# Altium PCB PCB.PcbDoc
Units mm, origin at the board's own origin, x right, y up, seen from the top; angles counter-clockwise.
Board outline 72.75 x 86.32 mm, 2 copper layers (Top Layer, Bottom Layer); 70 components, 56 nets, 293 pads, 65 vias.
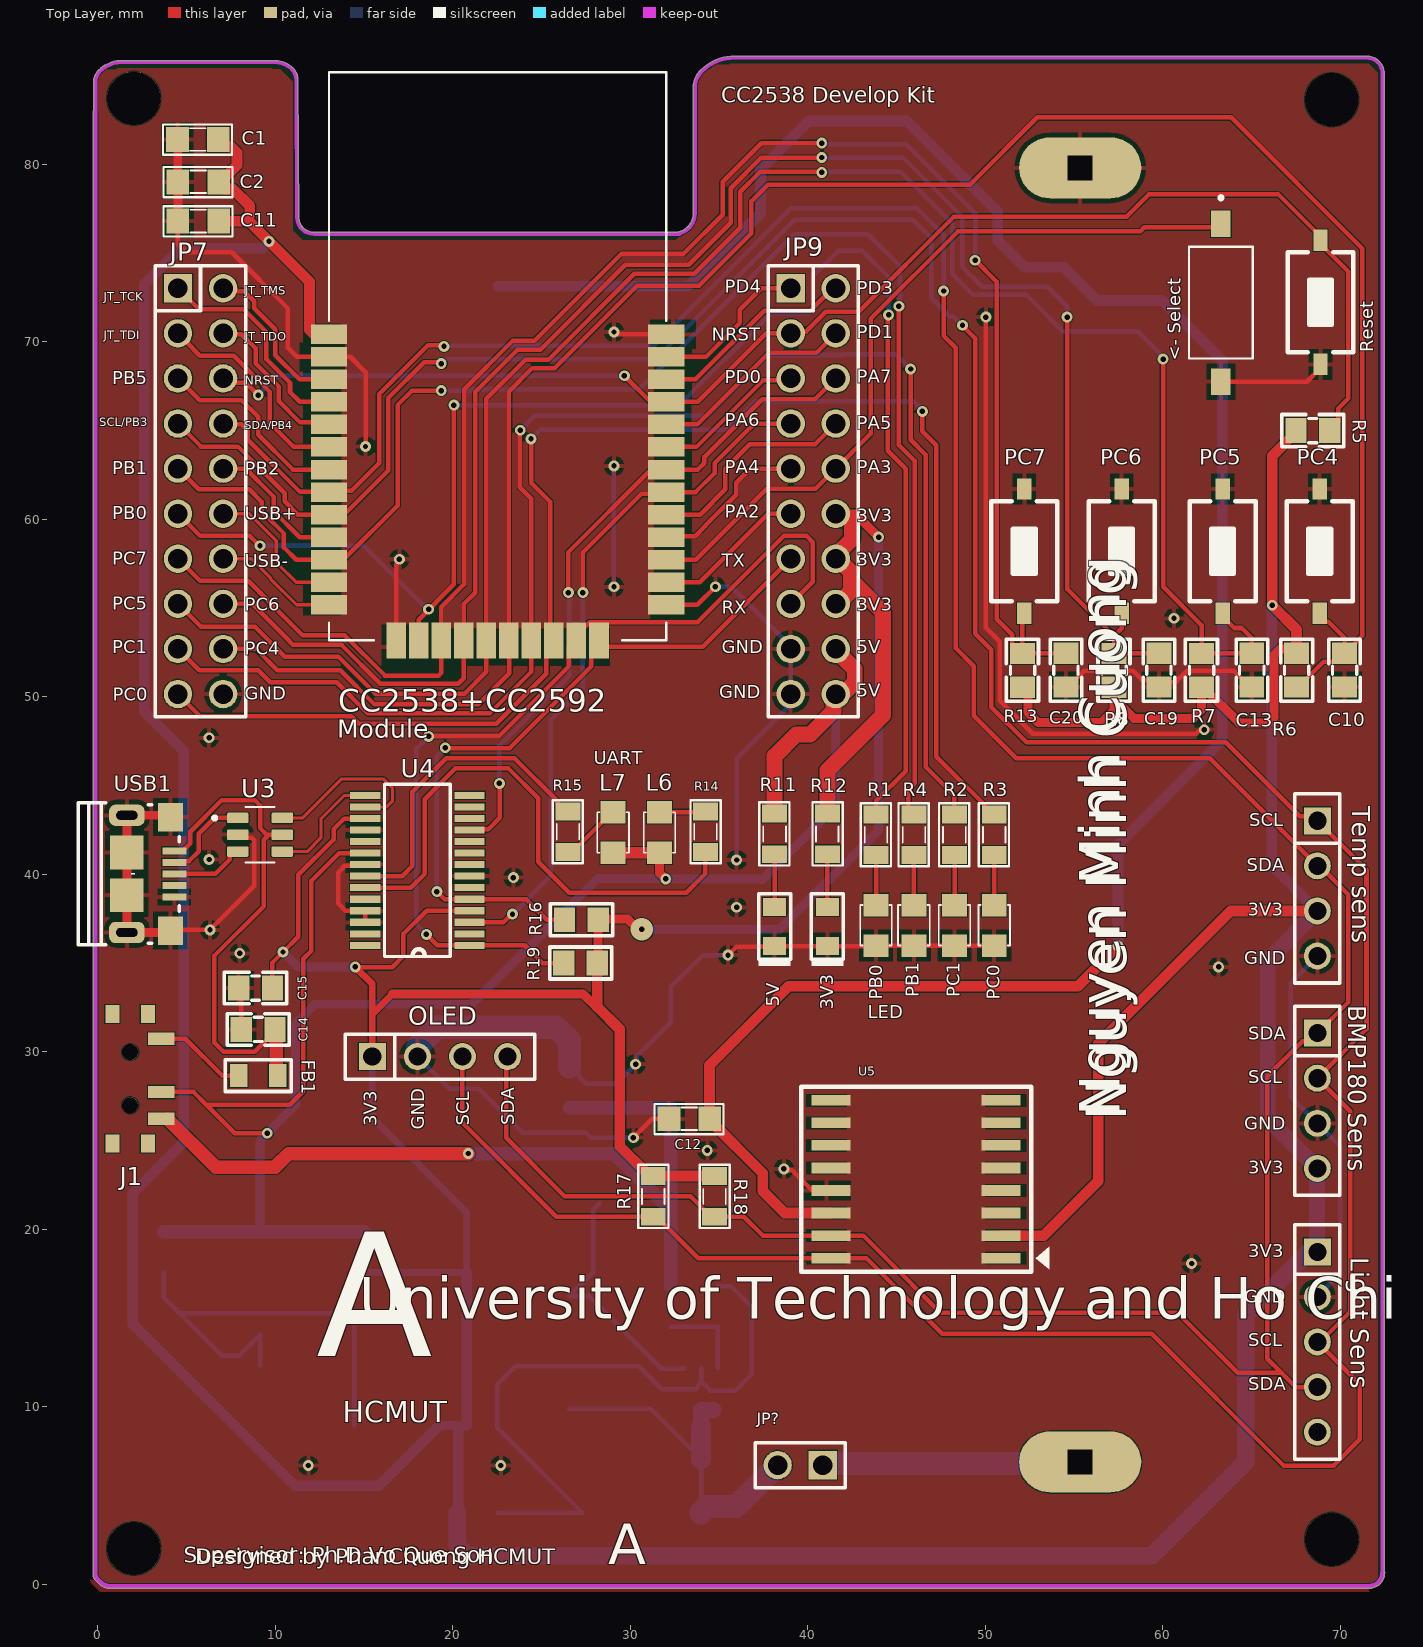
[diagram p0: Top Layer view]
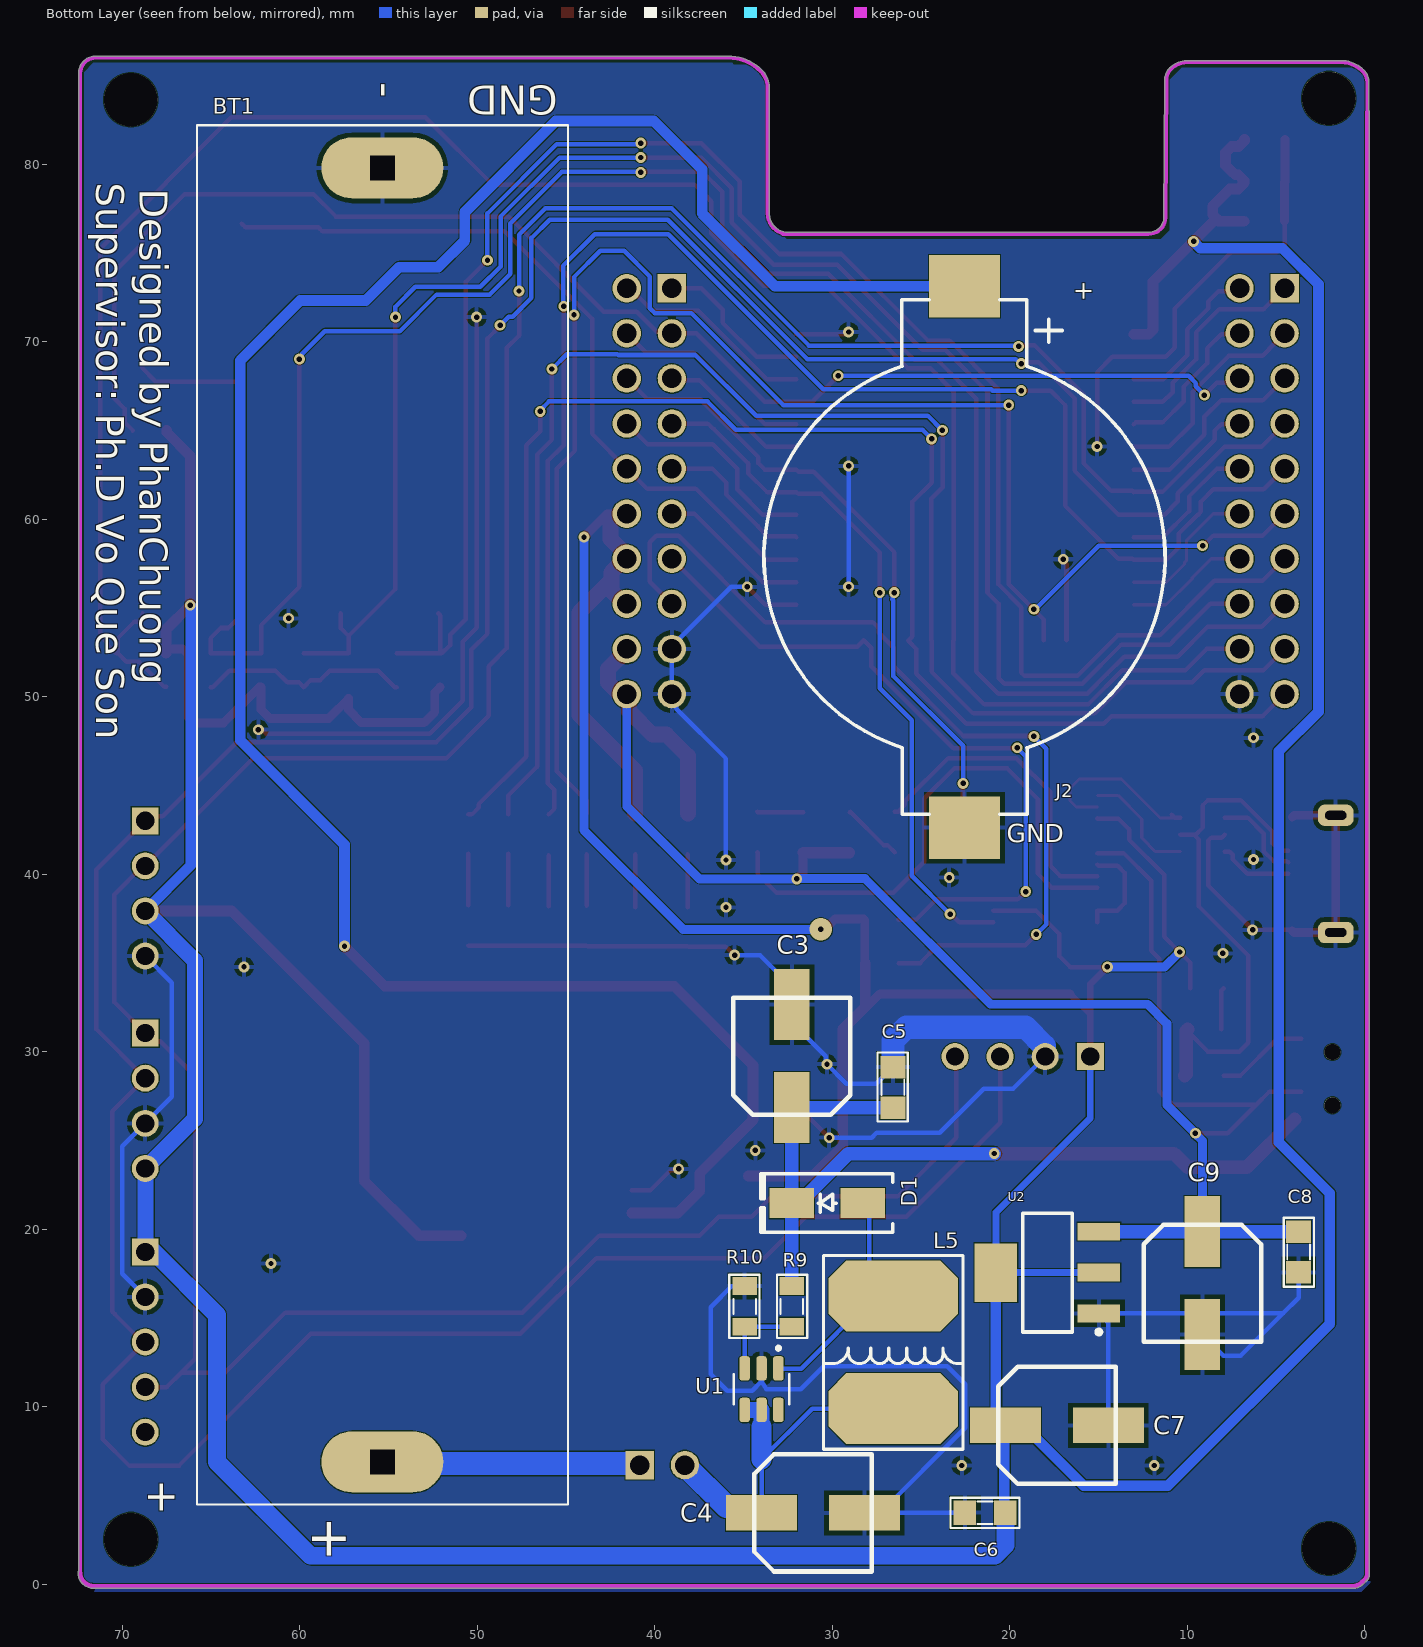
[diagram p1: Bottom Layer view, seen from below]
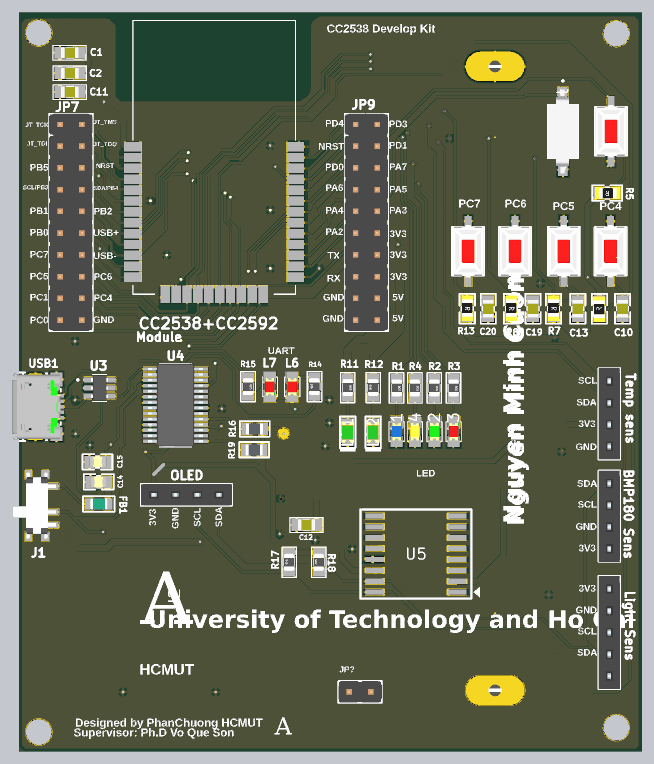
[diagram p2: 3D render of the assembled board from above, using the file's embedded part models]
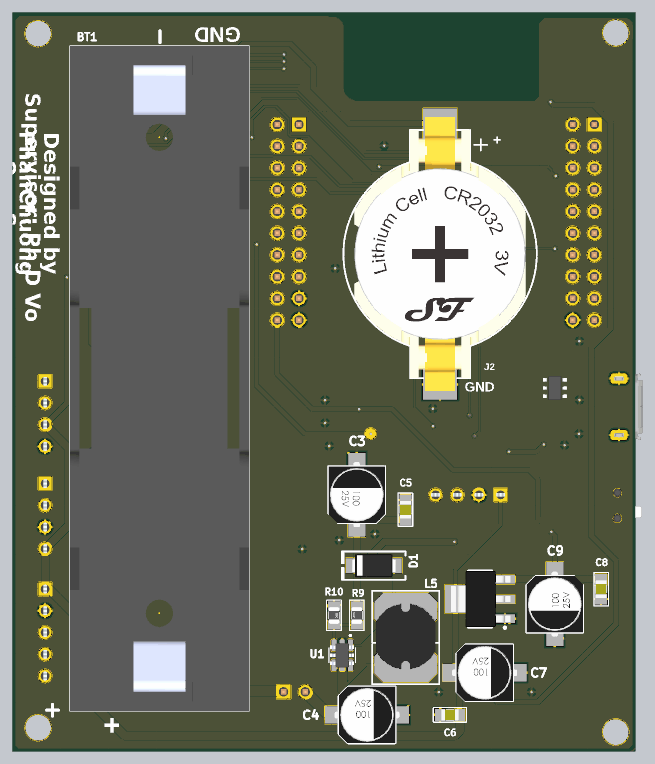
[diagram p3: 3D render of the assembled board from below, using the file's embedded part models]

## Layer stack, top to bottom
Top Solder: solder mask 0.0102, Solder Resist, Dk 3.5
Top Layer: signal copper 0.0356
Dielectric 1: dielectric 0.32, FR-4, Dk 4.8
Bottom Layer: signal copper 0.0356
Bottom Solder: solder mask 0.0102, Solder Resist, Dk 3.5

## Board outline
-0.252,0.486 ccw(c0.18,0.527) -0.127,0.22 0.111,-0.019 ccw(c0.635,0.505) 0.635,-0.236 71.622,-0.236 ccw(c71.622,0.635) 72.492,0.635 ccw(c72.365,0.635) 72.467,0.711 72.467,85.112 ccw(c71.496,85.111) 72.183,85.797 ccw(c71.497,85.112) 71.497,86.081 35.876,86.081 ccw(c35.876,83.377) 33.964,85.289 ccw(c34.956,84.297) 33.554,84.339 33.553,77.216 cw(c32.487,77.216) 32.487,76.15 12.204,76.15 cw(c12.204,77.057) 11.562,76.415 cw(c12.121,76.974) 11.331,76.974 11.278,84.71 ccw(c11.081,84.72) 11.278,84.731 ccw(c10.309,84.731) 10.994,85.416 ccw(c10.002,84.424) 10.044,85.826 1.353,85.827 ccw(c1.353,83.991) 0.055,85.289 ccw(c0.74,84.604) -0.229,84.604 -0.229,83.007 ccw(c-0.127,82.931) -0.254,82.931 -0.254,0.508 ccw(c-0.127,0.508)

## Design rules (kind name [scope] priority, off if disabled: settings)
Clearance [All] p1: gap=0.05 ignorepadtopadclearanceinfootprint=TRUE
DiffPairsRouting [All] p1: maxlimit=0.254 minlimit=0.127 mostfreqgap=0.178 toplayer_minwidth=0.178 toplayer_maxwidth=0.381 toplayer_prefwidth=0.254 bottomlayer_minwidth=0.178 bottomlayer_maxwidth=0.381 bottomlayer_prefwidth=0.254 maxuncoupledlength=12.7
PlaneClearance [All] p1: clearance=0.008
PlaneConnect [All] p1: planeconnectstyle=Direct reliefexpansion=0.508 reliefentries=4 reliefconductorwidth=0.254 reliefairgap=0.254
PolygonConnect PolygonConnect_2 [All vs IsNamedPolygon('GND_L01_P-001')] p1: connectstyle=Direct reliefconductorwidth=0.254 reliefentries=4 polygonreliefangle="90 Angle" airgapwidth=0.254
PolygonConnect PolygonConnect_1 [All vs IsNamedPolygon('GND_L01_P-001')] p2: connectstyle=Direct reliefconductorwidth=0.254 reliefentries=4 polygonreliefangle="90 Angle" airgapwidth=0.254
PolygonConnect [All] p3: connectstyle=Relief reliefconductorwidth=0.254 reliefentries=4 polygonreliefangle="90 Angle" airgapwidth=0.254
RoutingVias [All] p1: holewidth=0.305 width=0.61 viastyle="Through Hole" minholewidth=0.254 minwidth=0.508 maxholewidth=0.305 maxwidth=1.27
SolderMaskExpansion [All] p1: expansion=0.102 istentingtop=FALSE
Width [All] p1: maxlimit=1.3 minlimit=0.254 preferedwidth=0.254
27 further rules are at their usual default settings.

## Classes and differential pairs
component class RTC: C11 C12 J2 R17 R18 U5
component class Power: 3V3 5V BT1 C3 C4 C5 C6 C7 C8 C9 D1 FB1 J1 JP? L5 R9 R10 R11 R12 U1 U2
component class MCU: "<- Select" "BMP180 Sens" C1 C2 C10 C13 C19 C20 JP7 JP9 "Light Sens" Module OLED PB0 PB1 PC0 PC1 PC4 PC5 pc6 PC6 PC7 R1 R2 R3 R4 R5 R6 R7 R8 R13 Reset "Temp sens"
component class Flashing: C14 C15 L6 L7 R14 R15 R16 R19 U3 U4 USB1
differential pair USB1: +USB1_P -USB1_N
differential pair USB0: +USB0_P -USB0_N

## Components (designator, comment, footprint, x,y, rotation, side; value= is the part's Value field where it differs from the comment)
3V3 "LED-GREEN" LED_SMD0805_GREEN 41.104,37.041 r270 top (schematic designator LD2)
5V "LED-GREEN" LED_SMD0805_GREEN 38.132,37.041 r270 top (schematic designator LD1)
"<- Select" "Select" SW_KAE01SGGT 63.271,72.187 r270 top
"BMP180 Sens" "BMP180 Sen" "JP 1x4 CT" 68.707,31.039 r270 top (schematic designator JP3)
BT1 "BH-18650-PC" BAT_BH-18650-PC 55.347,43.331 r270 bottom locked
C1 "1uF" SM-0805 5.639,81.382 r0 top value=103
C2 "100nF" SM-0805 5.664,78.994 r0 top value=103
C3 "22uF" "tu nhom 6.3 (D)" 32.283,29.743 r90 bottom
C4 "22uF" "tu nhom 6.3 (D)" 31.09,4.011 r180 bottom
C5 "1uF" SM-0805 26.588,27.986 r270 bottom value=103
C6 "100nF" SM-0805 21.391,4.023 r180 bottom value=103
C7 "10uF" "tu nhom 6.3 (D)" 17.348,8.941 r180 bottom
C8 "100nF" SM-0805 3.734,18.708 r90 bottom value=103
C9 "10uF" "tu nhom 6.3 (D)" 9.148,16.951 r270 bottom
C10 "104" "tu 0805" 70.247,51.487 r270 top
C11 "1uF" SM-0805 5.664,76.784 r0 top value=103
C12 "1uF" SM-0805 33.325,26.213 r0 top value=103
C13 "104" "tu 0805" 65.015,51.487 r270 top
C14 "100nF" "Cap 0805" 9.042,31.242 r180 top
C15 "100nF" "Cap 0805" 8.89,33.579 r0 top
C19 "104" "tu 0805" 59.782,51.487 r270 top
C20 "104" "tu 0805" 54.55,51.487 r270 top
D1 "SS34" "DIODE SMA" 30.283,21.463 r0 bottom
FB1 "CIC21J601NE" INDC0805 9.042,28.651 r180 top
J1 "CUS-12TB" CUS-12B 1.829,28.473 r270 top
J2 "BU2032SM-HD-G" "BATTERY HOLDER_BU2032SM-HD-G" 22.555,57.861 r270 bottom
JP7 "JP 2x10 2.54" "JP 2x10 DT" 5.791,61.57 r270 top
JP9 "JP 2x10 2.54" "JP 2x10 DT" 40.31,61.57 r270 top
JP? "Test point" "JP 1x2 DT" 40.843,6.706 r180 top
L5 "22uH SMD" "Cuon Cam 7x7x5" 26.568,9.246 r180 bottom
L6 "LED 0805" LED-0805-Red 31.648,41.199 r90 top
L7 "LED 0805" LED-0805-Red 29.032,41.199 r90 top
"Light Sens" "Light Sen" "JP 1x5 CT" 68.707,18.72 r270 top (schematic designator JP2)
Module "HM10" CC2538+CC2541 13.029,53.169 r0 top
OLED "OLED" "JP 1x4 CT" 15.469,29.718 r0 top
PB0 "LED 0805" LED-0805-Blue 43.847,38.254 r270 top (schematic designator L1)
PB1 "LED 0805" LED-0805-Yellow 45.981,38.254 r270 top (schematic designator L4)
PC0 "LED 0805" LED-0805-Red 50.502,38.254 r270 top (schematic designator L3)
PC1 "LED 0805" LED-0805-Green 48.267,38.254 r270 top (schematic designator L2)
PC4 "SW-SMD" SW-SMD 68.841,58.191 r270 top (schematic designator S1)
PC5 "SW-SMD" SW-SMD 63.373,58.191 r270 top (schematic designator S2)
PC6 "SW-SMD" SW-SMD 57.683,58.191 r270 top (schematic designator S3)
PC7 "SW-SMD" SW-SMD 52.197,58.191 r270 top (schematic designator S5)
R1 "1k" RES-SMD-0805 43.847,42.215 r270 top
R2 "1k" RES-SMD-0805 48.26,42.215 r270 top
R3 "1k" RES-SMD-0805 50.502,42.215 r270 top
R4 "1k" RES-SMD-0805 45.981,42.215 r270 top
R5 "4K7" "tro smd 0805" 68.453,64.922 r180 top
R6 "4K7" "tro smd 0805" 67.475,51.484 r90 top
R7 "4K7" "tro smd 0805" 62.243,51.484 r270 top
R8 "4K7" "tro smd 0805" 57.315,51.484 r270 top
R9 "22k" RES-SMD-0805 32.283,15.647 r90 bottom
R10 "3k" RES-SMD-0805 34.94,15.646 r270 bottom
R11 "1k" RES-SMD-0805 38.132,42.266 r270 top
R12 "1k" RES-SMD-0805 41.104,42.266 r90 top
R13 "4K7" "tro smd 0805" 52.159,51.484 r270 top
R14 "1k" RES-SMD-0805 34.239,42.38 r90 top
R15 "1k" RES-SMD-0805 26.492,42.38 r270 top
R16 "470" "RES 0805" 27.254,37.414 r180 top
R17 "4K7" RES-SMD-0805 31.293,21.844 r90 top
R18 "4K7" RES-SMD-0805 34.747,21.844 r90 top
R19 "470" "RES 0805" 27.203,34.976 r180 top
Reset "SW-SMD" SW-SMD 68.885,72.212 r270 top (schematic designator S4)
"Temp sens" "Temp Sen" "JP 1x4 CT" 68.707,43.002 r270 top (schematic designator JP1)
U1 "MT3608" SOT95P280X145-6N#1 33.99,10.984 r270 bottom
U2 "AMS1117-3.3V" SOT223 17.886,17.551 r90 bottom value="AMS1117-3.3V SOT223"
U3 "USBLC6-2SC6" SOT95P280X145-6N#2 9.144,42.215 r0 top
U4 "FT232RL" TSSOP28_25.5_295_15X58_SMD 18.009,40.208 r180 top
U5 "DS3231" SL3016 46.101,22.809 r180 top
USB1 "USB Micro 5p DIP" "USB Micro 5p DIP" 1.643,40.01 r270 top

## Footprints (in the part's own frame and the unit in brackets; to place one, negate y for a bottom-side part, rotate by r counter-clockwise, add the part's x,y. Pads: shape width x height; smd on the part's side, far side on the other; paste and mask are expansions set on the pad)
BAT_BH-18650-PC [mm]
  oval 3.44x6.88 hole 1.38 square: N(-36.45,0) P(36.45,0)
  round 0 all layers, no hole: ""(-28.17,0) ""(27.44,0)
  silkscreen extent -38.85,-10.45 38.85,10.45, body extent -38.85,-10.45 38.85,10.45, height 21.31
"BATTERY HOLDER_BU2032SM-HD-G" [mm]
  rect 3.5x4 smd: 1(-15.25,0) 2(15.25,0)
  silkscreen extent -14.5,-11.3 14.5,11.3, body extent -16,-10 16,10, height 5.3
"Cap 0805" [mm] "Compoment SMD 80x50mil"
  rect 1.2x1.4 smd: 1(-0.946,-0.003) 2(0.954,-0.003)
  silkscreen extent -1.75,-0.89 1.75,0.89, body extent -0.97,-0.61 1.03,0.64, height 1.23
CC2538+CC2541 [mm]
  rect 2.032x1.1 smd mask+0.05: 1(0,17.24) 2(0,15.97) 3(0,14.7) 4(0,13.43) 5(0,12.16) 6(0,10.89) 7(0,9.62) 8(0,8.35) 9(0,7.08) 10(0,5.81) 11(0,4.54) 12(0,3.27) 13(0,2) 13(0,2) 24(19,2) 24(19,2) 25(19,3.27) 26(19,4.54) 27(19,5.81) 28(19,7.08) 29(19,8.35) 30(19,9.62) 31(19,10.89) 32(19,12.16) 33(19,13.43) 34(19,14.7) 35(19,15.97) 36(19,17.24)
  rect 1.1x2.032 smd mask+0.05: 14(3.78,0) 15(5.05,0) 16(6.32,0) 17(7.59,0) 18(8.86,0) 19(10.13,0) 20(11.4,0) 21(12.67,0) 22(13.94,0) 23(15.21,0)
  silkscreen extent 0,0 19,32
"Cuon Cam 7x7x5" [mm] "Cuon Cam 7x7x5"
  oct 7.3x4 smd: 1(0,0.635) 2(0,6.985)
  silkscreen extent -3.94,-1.65 3.94,9.27, body extent -3.5,0.07 3.5,7.8, height 5.02
CUS-12B [mm]
  rect 0.7x1.5 smd: P$1(-2.25,1.75) P$2(0.75,1.75) P$3(2.25,1.75)
  rect 1x0.8 smd: P$4(-3.65,1) P$5(-3.65,-1) P$6(3.65,-1) P$7(3.65,1)
  round 0.9 hole 0.9 unplated: ""(-1.5,0) ""(1.5,0)
  body extent -3.85,-2.8 3.85,2.2, height 1.4
"DIODE SMA" [mm] "SMA"
  rect 2.5x1.7 smd: 1(-2,0) 2(2,0)
  silkscreen extent -3.68,-1.65 3.75,1.65, body extent -2.6,-1.37 2.6,1.37, height 2.4
INDC0805 [mm]
  rect 1x1.3 smd: 1(-1.1,0) 2(1.1,0)
  silkscreen extent -1.85,-0.9 1.85,0.9, body extent -1,-0.65 1,0.65, height 1.18
"JP 1x2 DT" [mm] "2 pins, 1 row, straight, gold plating"
  rect 1.6x1.6 hole 1.1: 1(0,0)
  round 1.6 hole 1.1: 2(2.54,0)
  silkscreen extent -1.27,-1.27 3.81,1.27, body extent -1.27,-1.27 3.81,1.27, height 8.54
"JP 1x4 CT" [mm]
  rect 1.52x1.52 hole 1.02: 1(0,0)
  round 1.52 hole 1.02: 2(2.54,0) 3(5.08,0) 4(7.62,0)
  silkscreen extent -1.52,-1.27 9.14,1.27, body extent -1.52,-1.25 9.14,1.25, height 8.51
"JP 1x5 CT" [mm]
  rect 1.52x1.52 hole 1.02: 1(0,0)
  round 1.52 hole 1.02: 2(2.54,0) 3(5.08,0) 4(7.62,0) 5(10.16,0)
  silkscreen extent -1.52,-1.27 11.68,1.27, body extent -1.52,-1.25 11.68,1.25, height 8.51
"JP 2x10 DT" [mm] "20 pins, dual pin, straight, gold plating"
  rect 1.6x1.6 hole 1.1: 1(-11.43,-1.27)
  round 1.6 hole 1.1: 2(-8.89,-1.27) 3(-6.35,-1.27) 4(-3.81,-1.27) 5(-1.27,-1.27) 6(1.27,-1.27) 7(3.81,-1.27) 8(6.35,-1.27) 9(8.89,-1.27) 10(11.43,-1.27) 11(11.43,1.27) 12(8.89,1.27) 13(6.35,1.27) 14(3.81,1.27) 15(1.27,1.27) 16(-1.27,1.27) 17(-3.81,1.27) 18(-6.35,1.27) 19(-8.89,1.27) 20(-11.43,1.27)
  silkscreen extent -12.7,-2.54 12.7,2.54, body extent -12.7,-2.54 12.7,2.54, height 8.55
LED-0805-Blue [mil]
  rect 50x55 smd: 1(0,0) 2(90,0)
  silkscreen extent 0,-35 90,35, body extent 5,-25 85,25, height 43
LED-0805-Green [mil]
  rect 50x55 smd: 1(0,0) 2(90,0)
  silkscreen extent 0,-35 90,35, body extent 5,-25 85,25, height 43
LED-0805-Red [mil]
  rect 50x55 smd: 1(0,0) 2(90,0)
  silkscreen extent 0,-35 90,35, body extent 5,-25 85,25, height 43
LED-0805-Yellow [mil]
  rect 50x55 smd: 1(0,0) 2(90,0)
  silkscreen extent 0,-35 90,35, body extent 5,-25 85,25, height 43
LED_SMD0805_GREEN [mm]
  rect 1x1.3 smd: 1(-1.1,0) 2(1.1,0)
  silkscreen extent -1.85,-0.9 2.23,0.9, body extent -1.19,-0.75 1.21,0.75, height 0.9
"RES 0805" [mm]
  rect 1.2x1.4 smd: 1(-0.946,-0.01) 2(0.954,-0.01)
  silkscreen extent -1.75,-0.91 1.75,0.89, body extent -1,-0.62 1,0.63, height 0.5
RES-SMD-0805 [mil]
  rect 39.37x55 smd: 1(-45,0) 2(45,0)
  silkscreen extent -70,-34 70,33, body extent -39,-25 39,25, height 31
SL3016 [mm]
  rect 2.2x0.6 smd: 1(-4.795,4.445) 2(-4.795,3.175) 3(-4.795,1.905) 4(-4.795,0.635) 5(-4.795,-0.635) 6(-4.795,-1.905) 7(-4.795,-3.175) 8(-4.795,-4.445) 9(4.795,-4.445) 10(4.795,-3.175) 11(4.795,-1.905) 12(4.795,-0.635) 13(4.795,0.635) 14(4.795,1.905) 15(4.795,3.175) 16(4.795,4.445)
  silkscreen extent -7.49,-5.21 6.48,5.21, body extent -5.33,-5.15 5.33,5.15, height 2.65
SM-0805 [mil] "Compoment SMD 80x50mil"
  rect 50x55 smd: 1(-45,0) 2(45,0)
  silkscreen extent -77,-34 76,33, body extent -40,-25 40,25, height 24
SOT95P280X145-6N#1 [mm]
  rrect50% 1.37x0.59 smd: 1(-1.17,0.95) 2(-1.17,0) 3(-1.17,-0.95) 4(1.17,-0.95) 5(1.17,0) 6(1.17,0.95)
  silkscreen extent -2.4,-1.56 0.85,1.56, body extent -1.45,-1.4 1.45,1.4, height 1.45
SOT95P280X145-6N#2 [mm]
  rrect25% 1.21x0.59 smd: 1(-1.255,0.95) 2(-1.255,0) 3(-1.255,-0.95) 4(1.255,-0.95) 5(1.255,0) 6(1.255,0.95)
  silkscreen extent -2.65,-1.57 0.81,1.57, body extent -1.4,-1.46 1.4,1.46, height 0.4
SOT223 [mm]
  rect 1x2.4 smd: 1(-2.3,-2.9) 2(0,-2.9) 3(2.3,-2.9)
  rect 3.3x2.4 smd: 4(0,2.9)
  silkscreen extent -3.47,-3.02 3.35,1.4, body extent -3.25,-3.56 3.25,3.4, height 1.68
SW-SMD [mm] "Switch SMD type"
  rect 1.2x0.8 smd: 1(-3.5,0) 2(3.5,0)
  silkscreen extent -2.82,-1.85 2.82,1.85, body extent -3.05,-1.85 3.05,1.85, height 2.5
SW_KAE01SGGT [mm]
  rect 1.5x1.1 smd: 1(-4.45,0) 2(4.45,0)
  silkscreen extent -6.01,-1.79 3.15,1.79, body extent -4.9,-1.79 4.9,1.79, height 3.13
"tro smd 0805" [mm]
  rect 1.2x1.4 smd: 1(-0.946,-0.061) 2(0.954,-0.061)
  silkscreen extent -1.75,-0.97 1.75,0.84, body extent -1.56,-0.76 1.44,0.64, height 0.53
TSSOP28_25.5_295_15X58_SMD [mm] "CASE: TSSOP"
  rect 1.7x0.4 smd mask+0.076: 1(-2.938,4.225) 2(-2.938,3.575) 3(-2.938,2.925) 4(-2.938,2.275) 5(-2.938,1.625) 6(-2.938,0.975) 7(-2.938,0.325) 8(-2.938,-0.325) 9(-2.938,-0.975) 10(-2.938,-1.625) 11(-2.938,-2.275) 12(-2.938,-2.925) 13(-2.938,-3.575) 14(-2.938,-4.225) 15(2.938,-4.225) 16(2.938,-3.575) 17(2.938,-2.925) 18(2.938,-2.275) 19(2.938,-1.625) 20(2.938,-0.975) 21(2.938,-0.325) 22(2.938,0.325) 23(2.938,0.975) 24(2.938,1.625) 25(2.938,2.275) 26(2.938,2.925) 27(2.938,3.575) 28(2.938,4.225)
  silkscreen extent -1.85,-4.85 1.85,4.85, body extent -3.2,-4.85 3.2,4.85, height 1.1
"tu 0805" [mm] "Compoment SMD 80x50mil"
  rect 1.2x1.4 smd: 1(-0.946,-0.003) 2(0.954,-0.003)
  silkscreen extent -1.75,-0.89 1.75,0.89, body extent -1.01,-0.64 1.01,0.63, height 0.61
"tu nhom 6.3 (D)" [mm]
  rect 4x2 smd: 1(-2.9,0) 2(2.9,0)
  silkscreen extent -3.3,-3.3 3.3,3.3, body extent -3.8,-3.3 3.8,3.3, height 8
"USB Micro 5p DIP" [mm]
  rect 0.4x1.35 smd mask+0.05: 1(-1.3,2.675) 2(-0.65,2.675) 3(0,2.675) 4(0.65,2.675) 5(1.3,2.675)
  rrect60% 1.2x2 hole 0.5 slot 1.2 at 90 deg: 5(-3.3,0) 5(3.3,0)
  rect 1.6x1.4 smd: 5(-3.2,2.45) 5(3.2,2.45)
  rect 1.9x1.9 smd paste-10: 5(-1.2,0) 5(1.2,0)
  silkscreen extent -4,-2.75 4,2.95, body extent -3.93,-2.76 3.93,2.9, height 2.85

## Part data
3V3 5V: library part LED_LTST-C171KGKT, "LED GREEN CLEAR 0805 SMD", Color=Green, Current - Test=20mA, Lens Color=Colorless, Manufacturer="Lite-On Inc.", Manufacturer Part Number=LTST-C171KGKT, Millicandela Rating=35mcd, Package / Case="0805 (2012 Metric)", Supplier Part Number 1=160-1426-1-ND, Voltage - Forward (Vf) (Typ)=2V, Category=Optoelectronics, ComponentLink1Description=http://optoelectronics.liteon.com/upload/download/DS22-2000-118/LTST-C171KGKT.pdf, ComponentLink1URL=http://optoelectronics.liteon.com/upload/download/DS22-2000-118/LTST-C171KGKT.pdf, Features=-, Height (Max)=0.90mm, Lens Style/Size="Rectangle with Flat Top, 1.40mm x 1.25mm", Lens Transparency=Clear, Mounting Type="Surface Mount", Packaging="Cut Tape (CT)", Part Status=Active, Pricing 1="1=0.35, 10=0.255, 25=0.188, 100=0.1344, 250=0.09136, 500=0.08062, 1000=0.06314 (USD)", RoHS="RoHS Compliant", Size / Dimension="2.00mm L x 1.25mm W", Stock 1=329702, Supplier 1=Digi-Key, Viewing Angle=130°, Wavelength - Dominant=571nm, Wavelength - Peak=574nm
"<- Select": library part KAE01SGGT, "Dip Switch SPST 1 Position Surface Mount Slide (Standard) Actuator 25mA 24VDC", Package=None, Availability="In Stock", Check_prices=https://www.snapeda.com/parts/KAE01SGGT/E-Switch/view-part/?ref=eda, MF=E-Switch, MP=KAE01SGGT, Price=None, Purchase-URL=https://pricing.snapeda.com/search/part/KAE01SGGT/?ref=eda, SnapEDA_Link=https://www.snapeda.com/parts/KAE01SGGT/E-Switch/view-part/?ref=snap
"BMP180 Sens" OLED "Temp sens": library part "JP 1x4 2.54 Cai Thang", "Cắm", Chung_Loai=Cắm, Don_Vi=Con, Ma_Hang=MH004006, Ten_Linh_Kien="Jump Đơn Cái 2.54MM 1x20P Thẳng"
BT1: "Battery Holder (Open) 18650 1 Cell PC Pin", Package=None, Check_prices=https://www.snapeda.com/parts/BH-18650-PC/Memory+Protection+Devices/view-part/?ref=eda, MF="Memory Protection Devices", MP=BH-18650-PC, SnapEDA_Link=https://www.snapeda.com/parts/BH-18650-PC/Memory+Protection+Devices/view-part/?ref=snap
C1 C2 C5 C6 C8 C11 C12: library part CM, "Cap SMD"
C3 C4 C7 C9: library part "Tu Nhom 22uF 25V", "Dán", Chung_Loai=Dán, Don_Vi=Con, Ma_Hang=MH007613, So_Chan=2, Ten_Linh_Kien="Tụ Nhôm 22uF 25V"
C10 C13 C19 C20: library part "Tu 0805 104 50V 10%", "Dán", Chung_Loai=Dán, Don_Vi=Con, Ma_Hang=MH004551, So_Chan=2, Ten_Linh_Kien="Tụ 0805 104-100nF 10% 50V"
C14 C15: library part "Cap 0805", "Capacitor SMD 0805"
D1: library part "Diode SS34 ( 1N5822 )", "Dán", Chung_Loai=Dán, Don_Vi=Con, Ma_Hang=MH002104, Ten_Linh_Kien="Diode SS34 3A 40V SMA ( 1N5822 SS34A)"
FB1: library part "FERRITE BEAD_CIC21J601NE", "FERRITE BEAD 600 OHM 0805 1LN", Current Rating (Max)=1A, DC Resistance (DCR) (Max)="100 mOhm", Manufacturer="Samsung Electro-Mechanics", Operating Temperature="-55°C ~ 125°C", Package / Case="0805 (2012 Metric)", Ratings=-, Supplier Part Number 1=1276-6371-1-ND, Category=Filters, ComponentLink1Description=http://www.samsungsem.com/kr/support/product-search/bead/CIC21J601NE.jsp, ComponentLink1URL=http://www.samsungsem.com/kr/support/product-search/bead/CIC21J601NE.jsp, Filter Type="Power Line", Height (Max)="0.043\" (1.10mm)", Manufacturer Part Number=CIC21J601NE, Mounting Type="Surface Mount", Packaging="Cut Tape (CT)", Part Status=Active, Pricing 1="1=0.1, 10=0.066, 25=0.06, 50=0.054, 100=0.0396, 250=0.0288, 500=0.0264, 1000=0.0228 (USD)", RoHS="RoHS Compliant", Size / Dimension="0.079\" L x 0.049\" W (2.00mm x 1.25mm)", Stock 1=98190, Supplier 1=Digi-Key
J1: "Slide Switch SPDT Surface Mount, Right Angle", Package=None, Check_prices=https://www.snapeda.com/parts/CUS-12TB/Nidec/view-part/?ref=eda, MF="Nidec Copal", MP=CUS-12TB, SnapEDA_Link=https://www.snapeda.com/parts/CUS-12TB/Nidec/view-part/?ref=snap
J2: library part "BATTERY HOLDER_BU2032SM-HD-G", "HOLDER COIN CELL 2032 SMD", Manufacturer="MPD (Memory Protection Devices)", Operating Temperature="-40°C ~ 280°C", Supplier Part Number 1=BU2032SM-HD-GDKR-ND, Battery Cell Size="Coin, 20.0mm", Battery Series=2032, Battery Type, Function="Coin Cell, Holder", Category="Battery Products", ComponentLink1Description=http://www.memoryprotectiondevices.com/datasheets/BU2032SM-HD-G-datasheet.pdf, ComponentLink1URL=http://www.memoryprotectiondevices.com/datasheets/BU2032SM-HD-G-datasheet.pdf, Height Above Board="0.208\" (5.28mm)", Manufacturer Part Number=BU2032SM-HD-G, Mounting Type="PCB, Surface Mount", Number of Cells=1, Part Status=Active, Pricing 1="1=0.89, 10=0.828 (USD)", RoHS="RoHS Compliant", Stock 1=72564, Style="Holder (Open)", Supplier 1=Digi-Key, Termination Style="SMD (SMT) Tab"
JP7 JP9: library part "JP 2x10 2.54 Duc Thang", "Cắm", Chung_Loai=Cắm, Don_Vi=Con, Ma_Hang=MH002686, Ten_Linh_Kien="Jump Đôi Đực 2.54MM 2x40P Thẳng 11MM"
JP?: library part "JP 1x2 2.54 Duc Thang", "Cắm", Chung_Loai=Cắm, Don_Vi=Con, Ma_Hang=MH000903, Ten_Linh_Kien="Jump Đơn Đực 2.54MM 1x40P Thẳng 11MM"
L5: library part "CUON CAM 47uH SMD", "Dán", Chung_Loai=Dán, Don_Vi=Con, Ma_Hang=MH004211, Ten_Linh_Kien="Cuộn Cảm 47uH 7x7x4MM CD74R"
L6 L7 PC0: library part "LED 0805 Do", "Dán", Chung_Loai=Dán, Don_Vi=Con, Ma_Hang=MH000897, Ten_Linh_Kien="LED 0805 Màu Đỏ (Red)"
"Light Sens": library part "JP 1x5 2.54 Cai Thang", "Cắm", Chung_Loai=Cắm, Don_Vi=Con, Ma_Hang=MH004006, Ten_Linh_Kien="Jump Đơn Cái 2.54MM 1x20P Thẳng"
Module: library part "CC2538 HM10", "BLE HM10"
PB0: library part "LED 0805 Xanh Duong", "Dán", Chung_Loai=Dán, Don_Vi=Con, Ma_Hang=MH002327, Ten_Linh_Kien="LED 0805 Màu Xanh Dương (Blue)"
PB1: library part "LED 0805 Vang", "Dán", Chung_Loai=Dán, Don_Vi=Con, Ma_Hang=MH002329, Ten_Linh_Kien="LED 0805 Màu Vàng ( Yellow)"
PC1: library part "LED 0805 Xanh La", "Dán", Chung_Loai=Dán, Don_Vi=Con, Ma_Hang=MH002326, Ten_Linh_Kien="LED 0805 Màu Xanh Lá (Green)"
PC4 PC5 PC6 PC7 Reset: "Switch", LatestRevisionDate=17-Jul-2002, LatestRevisionNote="Re-released for DXP Platform.", PackageReference=SPST-2, Published=24-Mar-1999, Publisher="Altium Limited"
R1 R2 R3 R4 R9 R10 R11 R12 R14 R15 R17 R18: library part R, "Resistor R1/4W"
R5 R6 R7 R8 R13: library part "Tro 0805 1% 0.22R", "Dán", Chung_Loai=Dán, Don_Vi=Con, Ma_Hang=MH005466, So_Chan=2, Ten_Linh_Kien="Trở 0805 1% 0.22R"
R16 R19: library part "RES 0805", "RES SMD 0805", Manufacturer="Vishay Dale", Manufacturer Part Number=CRCW040210K0FKED, Operating Temperature="-55°C ~ 155°C", Package / Case="0402 (1005 Metric)", Power (Watts)="0.063W, 1/16W", Resistance (Ohms)=10k, Supplier Part Number 1=541-10.0KLCT-ND, Temperature Coefficient=±100ppm/°C, Tolerance=±1%, Category=Resistors, ComponentLink1Description=http://www.vishay.com/docs/20035/dcrcwe3.pdf, ComponentLink1URL=http://www.vishay.com/docs/20035/dcrcwe3.pdf, Composition="Thick Film", Features="Automotive AEC-Q200", Height="0.016\" (0.40mm)", Number of Terminations=2, Packaging="Cut Tape (CT)", Pricing 1="10=0.083, 50=0.0444, 200=0.0255, 1000=0.0174 (USD)", RoHS="RoHS Compliant", Size / Dimension="0.039\" L x 0.020\" W (1.00mm x 0.50mm)", Stock 1=2392462, Supplier 1=Digi-Key, Supplier Device Package="0402 (1005 Metric)"
U1: "High Efficiency 1.2MHz2A Step Up Converter", Package=Package, Availability="Not in stock", Check_prices=https://www.snapeda.com/parts/MT3608/Aerosemi+Technology+Co.%252C+Ltd/view-part/?ref=eda, MF="Aerosemi Technology Co., Ltd", MP=MT3608, Price=None, SnapEDA_Link=https://www.snapeda.com/parts/MT3608/Aerosemi+Technology+Co.%252C+Ltd/view-part/?ref=snap
U2: library part "AMS1117 SMD", "Dán", Chung_Loai=Dán, Don_Vi=Con, Ma_Hang=MH000596
U3: "17V Clamp 5A (8/20Âµs) Ipp Tvs Diode Surface Mount SOT-23-6", Package="SOT-23-6 STMicroelectronics", Availability="In Stock", Check_prices=https://www.snapeda.com/parts/USBLC6-2SC6/STMicroelectronics/view-part/?ref=eda, MF=STMicroelectronics, MP=USBLC6-2SC6, Price=None, Purchase-URL=https://pricing.snapeda.com/search/part/USBLC6-2SC6/?ref=eda, SnapEDA_Link=https://www.snapeda.com/parts/USBLC6-2SC6/STMicroelectronics/view-part/?ref=snap
U4: library part IC_FT232RL, "USB Bridge, USB to UART USB 2.0 UART Interface 28-SSOP", Alternate Part Number-1=NA, Case/Package=TSSOP28, Manufacturer=FTDI, Manufacturer Part Number=FT232RL, Supplier Part Number-1=FT232RL, Supplier-1=Aliepress
USB1: "USB Type B", Ma_Hang=MH005145, Ten="MicroUSB MK5P DIP"

## Free pads (board coordinates)
  round 2.997 hole 2.997: 4(2.032,2.007) 4(2.032,83.693) 4(69.52,2.515) 4(69.52,83.617)

## Via types
v1: diameter 0.61, hole 0.305, Top Layer to Bottom Layer, tented both sides, 64 vias
v2: diameter 1.27, hole 0.305, Top Layer to Bottom Layer, 1 vias

## Nets (pads, with @x,y where several pads share a name; then routed paths per layer and width w, separated by ;. In a path a pad name is that pad's centre, name@x,y a point inside that pad or via, vN(x,y) a via of type N, cw(c..) or ccw(c..) an arc to the next point about the centre after c; other vN are vias at no path point)
3V3: "BMP180 Sens.4" "Light Sens.1" "Temp sens.3" C1.2 C2.2 C6.2 C7.1 C11.2 C15.2 JP9.13 JP9.14 JP9.15 Module.1 OLED.1 R5.2 R6.2 R7.2 R8.2 R12.2 R13.2 R16.1 R17.2 R18.2 R19.1 U2.2 U2.4 U4.4 U4.17 U5.2 | length 439
  Top Layer w0.254: C15.2 9.844,35.016 v1(10.439,35.611) 11.303,36.474 11.303,39.954 13.284,41.935 13.284,42.52 13.894,43.129 15.067,43.129 U4.17 ; v1@14.529,34.747 16.586,34.747 17.221,35.382 17.221,36.627 18.528,37.933 U4.4
  Top Layer w0.381: v1(14.503,34.773) 14.529,34.747 15.469,33.807 15.469,32.106 ; OLED.1 15.469,32.106 ; 16.612,33.249 15.469,32.106
  Top Layer w0.5: 16.612,33.249 27.33,33.249 28.098,32.481 29.413,31.166 ; R19.1 28.174,35.011 28.174,37.399 R16.1 28.241,37.465 29.865,37.465 30.449,36.881 v2(30.658,36.881) ; JP9.15 42.672,60.3 v1(43.993,58.979) ; R13.2 52.4,50.228 52.4,49.124 52.988,48.535 56.536,48.535 57.254,49.253 57.254,49.891 58.378,48.768 61.697,48.768 62.182,49.253 R7.2 62.282,50.53 64.298,48.514 65.976,48.514 66.269,48.807 66.269,52.349 66.599,52.68 67.295,52.68 R6.2
  Top Layer w0.6: C1.2 6.782,81.318 7.117,80.983 7.497,80.983 7.849,80.632 7.849,79.93 7.497,79.578 7.494,79.578 7.308,79.393 7.142,79.393 6.807,79.057 C2.2 6.807,78.93 7.142,78.595 7.612,78.595 8.575,77.633 8.575,77.136 8.223,76.784 C11.2 ; 8.338,76.879 8.414,76.879 v1(9.652,75.641) 11.932,73.361 11.932,70.659 12.182,70.409 Module.1 ; R19.1 28.149,32.532 29.413,31.267 29.413,31.166 29.413,24.668 30.894,23.187 31.094,22.987 R17.2 R18.2 ; U5.2 53.289,19.634 56.363,22.708 56.363,30.455 63.83,37.922 68.707,37.922 ; R5.2 67.499,64.883 66.167,63.552 v1(66.167,55.143) 67.536,53.775 R6.2 ; 68.85,18.791 68.874,18.767
  Top Layer w0.9: R12.2 41.104,45.828 42.037,46.761 44.247,48.971 44.247,54.737 42.443,56.54 ; JP9.13 41.707,55.22 42.443,55.956 42.443,56.54 ; JP9.14 41.58,57.949 42.493,58.862 42.493,59.843 JP9.15@42.17,60.166 ; JP9.14@41.631,57.81 42.443,56.998 42.443,56.54 ; 68.672,37.913 68.713,37.913
  Bottom Layer w0.381: U2.2 U2.4 20.786,20.946 15.469,26.264 OLED.1 ; C6.2 C6.2@20.32,4.095 ; C7.1@20.32,8.869 C7.1 C7.1@20.786,8.941
  Bottom Layer w0.5: v1(10.439,35.611) 11.278,34.773 v1(14.503,34.773) ; C7.1@19.248,8.941 C7.1 ; v2(30.658,36.881) 38.405,36.881 43.993,42.469 v1(43.993,58.979)
  Bottom Layer w0.6: v1(9.652,75.641) 9.271,75.26 4.649,75.26 2.616,73.228 2.616,49.149 4.851,46.914 4.851,24.892 1.981,22.022 1.981,14.656 11.1,5.537 15.845,5.537 C7.1@19.248,8.941 ; C6.2@20.32,4.095 C7.1@20.32,8.869 ; C7.1@20.786,8.941 U2.4 ; v1(66.167,55.143) 66.167,55.141 66.142,55.115 66.142,40.488 68.707,37.922
  Bottom Layer w0.9: 68.707,18.72 68.682,18.745 68.682,23.393 68.707,23.419 ; 68.707,37.922 65.913,35.128 65.913,26.213 68.707,23.419 ; 68.758,23.368 68.707,23.419
  Bottom Layer w1: C6.2 20.248,2.186 20.834,1.6 59.395,1.6 64.668,6.874 64.668,15.164 68.224,18.72 68.707,18.72
5V: C8.2 C9.1 J1.P$2 JP9.11 JP9.12 L6.1 L7.1 R11.1 U2.3 U4.20 | length 110.6
  Top Layer w0.254: J1.P$2 5.398,27.723 6.121,27 ; v1(9.55,25.4) 7.722,25.4 6.121,27 ; U4.20 13.599,41.183 12.04,39.624 12.04,35.687 11.582,35.23 11.582,27.762 10.82,27 6.121,27
  Top Layer w0.5: L6.1 31.648,40.069 31.992,39.726 v1(32.004,39.726)
  Top Layer w0.635: L7.1 L6.1
  Top Layer w0.9: R11.1 38.132,46.641 39.351,47.86 40.139,47.86 41.446,49.167 41.446,50.006 JP9.11 41.714,50.274 42.119,50.274 42.647,50.801 42.647,51.546 41.58,52.613 JP9.12
  Bottom Layer w0.5: C9.1 9.148,24.968 9.55,25.37 v1(9.55,25.4) 11.151,27 11.151,31.572 12.243,32.664 21.082,32.664 28.169,39.751 31.901,39.751 31.906,39.747 31.983,39.747 v1(32.004,39.726) 37.49,39.726 41.58,43.815 JP9.11
  Bottom Layer w0.762: C8.2 C9.1 U2.3
5V_BAT: C3.1 C5.2 D1.2 J1.P$3 R9.2 | length 46.7
  Top Layer w0.762: J1.P$3@3.948,26.192 6.645,23.495 9.993,23.495 10.755,24.257 v1(20.879,24.257)
  Bottom Layer w0.762: v1(20.879,24.257) 29.089,24.257 31.883,21.463 D1.2 ; C5.2 C3.1 D1.2 ; R9.2 D1.2
5V_USB: C14.1 FB1.1 U3.5 USB1.1 | length 28.9
  Top Layer w0.254: USB1.1 4.793,41.31 5.207,41.724 5.207,42.393 6.985,44.171 8.839,44.171 9.144,43.866 9.144,42.596 9.525,42.215 ; C14.1 9.988,31.145 8.84,29.997 7.087,29.997 6.579,30.505 6.579,35.408 9.347,38.176 9.347,41.935 9.627,42.215 10.089,42.215 U3.5
  Top Layer w0.762: C14.1 10.065,31.168 10.065,28.728 FB1.1
GND: 3V3.2 5V.2 "<- Select.2" "BMP180 Sens.3" "Light Sens.2" "Temp sens.4" BT1.N C1.1 C2.1 C3.2 C4.2 C5.1 C6.1 C7.2 C8.1 C9.2 C10.2 C11.1 C12.1 C13.2 C14.2 C15.1 C19.2 C20.2 J2.2 JP7.11 JP9.9 JP9.10 Module.2 Module.14 Module.24 Module.36 OLED.2 PB0.2 PB1.2 PC0.2 PC1.2 PC4.1 PC5.1 PC6.1 PC7.1 R10.1 Reset.2 U1.2 U2.1 U3.2 U4.7 U4.18 U4.21 U4.25 U4.26 U5.13 USB1.5 | length 288.3
  Top Layer w0.254: USB1.5@4.093,36.81 4.139,36.855 v1(6.325,36.855) 8.814,39.345 8.814,41.898 8.665,42.047 8.057,42.047 U3.2 ; C11.1 4.521,75.463 4.953,75.032 7.544,75.032 10.719,71.857 10.719,69.647 11.227,69.139 Module.2 14.224,69.139 15.088,68.275 v1(15.088,64.084) ; C15.1 8.088,33.432 C14.2 ; U4.26 U4.25 13.959,37.933 13.538,38.354 13.538,40.081 13.917,40.46 14.998,40.46 U4.21 ; Module.14 16.809,57.455 16.993,57.638 v1(16.993,57.734) ; v1(29.083,70.536) 29.179,70.536 29.306,70.409 Module.36 ; v1(30.175,25.146) 31.242,26.213 C12.1 ; Module.24@32.029,55.169 33.782,55.169 v1(34.798,56.185) ; v1(35.509,35.433) 35.514,35.433 35.996,35.916 38.107,35.916 5V.2 3V3.2 43.82,35.941 PB0.2 PB1.2 PC1.2 PC0.2 ; v1(38.659,23.393) 38.727,23.325 39.105,23.325 40.256,22.174 U5.13 ; v1(50.038,71.374) 50.038,53.873 50.825,53.086 50.825,49.759 52.68,47.904 61.878,47.904 62.039,48.065 62.264,48.065 v1(62.332,48.133) ; C20.2 54.646,50.532 55.575,51.46 58.318,51.46 58.847,50.932 59.38,50.932 C19.2 60.046,50.799 60.711,50.799 61.372,51.46 63.983,51.46 64.911,50.532 C13.2 ; 63.271,67.737 68.109,67.737 68.885,68.512 Reset.2
  Top Layer w0.5: USB1.5@4.093,36.81 3.993,36.71 1.643,36.71 1.643,38.81 1.643,41.21 1.643,43.31 3.993,43.31 USB1.5@4.093,43.21 ; C1.1 4.508,81.369 4.508,79.007 C2.1 C11.1
  Bottom Layer w0.254: C8.1 3.734,16.129 4.611,15.251 ; C9.2@9.148,12.317 C9.2 7.975,12.878 6.985,12.878 4.611,15.251 ; C7.2 14.453,8.941 14.453,14.718 U2.1 4.611,15.251 ; OLED.2 19.82,27.907 21.471,27.907 21.895,27.483 23.952,25.425 27.508,25.425 27.788,25.146 v1(30.175,25.146) ; C6.1 25.349,4.023 25.362,4.011 27.308,4.011 22.504,8.814 22.504,11.252 23.52,12.268 30.48,12.268 31.775,10.973 33.71,10.973 33.99,11.426 ; C5.1 26.652,29.129 27.16,28.621 27.16,28.558 27.524,28.194 29.21,28.194 v1(30.302,29.286) 30.37,29.354 30.37,29.73 32.283,31.643 C3.2 32.283,33.643 34.073,35.433 v1(35.509,35.433) ; v1(29.083,56.185) v1(29.083,62.992) ; U1.2 33.99,11.426 ; v1(34.798,56.185) 35.687,56.185 39.04,52.832 JP9.9 JP9.10 ; R10.1 35.662,16.789 36.855,15.596 36.855,11.836 35.916,10.897 34.519,10.897 33.99,11.426 ; v1(35.992,40.792) 35.992,46.507 38.802,49.318 JP9.10@38.802,49.457 ; 68.707,16.18 70.002,17.475 70.002,24.663 68.707,25.959 67.208,27.457 67.208,33.884 68.707,35.382
  Bottom Layer w1.3: OLED.2 18.051,29.76 18.051,30.303 19.117,31.369 25.827,31.369 26.588,30.607 C5.1
  other v1: 11.862,6.68 22.708,6.68 61.62,18.059 34.341,24.435 63.144,34.773 8.001,35.535 35.992,38.125 23.419,39.802 6.274,40.818 6.274,47.676 60.63,54.407
JTAG_TCK: JP7.1 Module.4 | length 12.4
  Top Layer w0.254: JP7.1 5.69,71.831 8.204,71.831 9.5,70.536 9.5,69.012 10.832,67.679 10.832,67.146 11.379,66.599 Module.4
JTAG_TDI: JP7.2 Module.6 | length 12.2
  Top Layer w0.254: JP7.2 5.385,69.596 5.385,69.571 5.753,69.202 7.658,69.202 9.703,67.158 9.703,65.405 11.049,64.059 Module.6
JTAG_TDO: JP7.19 Module.5 | length 9.1
  Top Layer w0.254: JP7.19 7.103,70.418 8.093,70.418 8.89,69.621 8.89,68.783 10.211,67.462 10.211,66.631 11.4,65.441 12.917,65.441 Module.5
JTAG_TMS: JP7.20 Module.3 | length 9.2
  Top Layer w0.254: JP7.20 7.226,72.835 8.242,72.835 8.814,72.263 8.814,71.882 10.008,70.688 10.008,69.229 11.368,67.869 Module.3
Net3V3_1: 3V3.1 R12.1 | length 3
  Top Layer w0.254: 3V3.1 R12.1
Net5V_1: 5V.1 R11.2 | length 3
  Top Layer w0.254: 5V.1 R11.2
NetBT1_P: BT1.P JP?.1 | length 15
  Bottom Layer w1.3: JP?.1 40.931,6.793 55.282,6.793 BT1.P@55.662,6.413
NetC4_1: C4.1 JP?.2 L5.1 U1.4 U1.5 | length 20.5
  Bottom Layer w0.254: L5.1 31.137,9.881 33.99,7.028 C4.1
  Bottom Layer w0.889: 33.99,8.883 U1.5 U1.4@34.696,9.814
  Bottom Layer w1.143: 33.99,7.028 33.99,8.883
  Bottom Layer w1.3: C4.1 34.34,4.361 35.958,4.361 JP?.2
NetD1_1: D1.1 L5.2 U1.1 | length 14.1
  Bottom Layer w0.254: D1.1 27.915,21.094 27.915,17.577 L5.2 27.661,16.231 31.75,12.141 33.04,12.141 U1.1
NetFB1_2: FB1.2 J1.P$1 | length 5.2
  Top Layer w0.254: J1.P$1 4.938,30.723 7.01,28.651 FB1.2
NetL6_2: L6.2 R14.2 | length 2.6
  Top Layer w0.254: L6.2 34.201,43.485 R14.2
NetL7_2: L7.2 R15.2 | length 3.5
  Top Layer w0.254: R15.2 26.865,41.61 27.094,41.61 28.969,43.485 L7.2 L7.2@28.994,43.523
NetPB0_1: PB0.1 R1.2 | length 2.9
  Top Layer w0.254: PB0.1@43.847,38.227 R1.2@43.847,41.123
NetPB1_1: PB1.1 R4.2 | length 2.9
  Top Layer w0.254: PB1.1@45.981,38.176 R4.2
NetPC0_1: PC0.1 R3.2 | length 2.9
  Top Layer w0.254: PC0.1@50.502,38.252 R3.2@50.502,41.148
NetPC1_1: PC1.1 R2.2 | length 2.9
  Top Layer w0.254: PC1.1@48.267,38.252 R2.2@48.267,41.148
NetR9_1: R9.1 R10.2 U1.3 | length 5
  Bottom Layer w0.254: R9.1 R10.2 U1.3
NetR14_1: R14.1 U4.23 | length 31.1
  Top Layer w0.254: U4.23 17.643,39.233 18.415,40.005 18.415,44.221 20.142,45.949 23.139,45.949 24.816,44.272 24.816,40.691 26.568,38.938 33.147,38.938 34.214,40.005 34.214,41.211 R14.1
NetR15_1: R15.1 U4.22 | length 18
  Top Layer w0.254: U4.22 17.15,39.883 17.729,40.462 17.729,44.628 19.634,46.533 23.482,46.533 25.921,44.094 25.921,43.896 26.294,43.523 R15.1
NetU3_1: U3.1 USB1.2 | length 5.2
  Top Layer w0.254: USB1.2 4.391,40.733 5.147,40.733 5.69,41.275 5.69,42.266 6.589,43.165 U3.1
NetU3_3: U3.3 USB1.3 | length 4.3
  Top Layer w0.254: USB1.3 6.634,40.01 7.445,40.821 7.445,41.097 7.613,41.265 U3.3
NRST: JP7.18 JP9.2 Module.33 R5.1 Reset.1 | length 81.2
  Top Layer w0.254: JP7.18 7.297,67.684 8.338,67.684 v1(9.042,66.98) ; v1(29.667,68.072) 31.14,66.599 33.807,66.599 37.668,70.46 JP9.2 39.141,70.561 39.907,70.561 40.056,70.71 40.056,70.714 41.021,71.679 42.875,71.679 48.235,77.038 57.963,77.038 59.207,78.283 66.514,78.283 68.885,75.912 68.885,75.512 70.46,73.937 70.46,66.802 69.872,66.214 69.872,65.456 R5.1
  Bottom Layer w0.254: v1(9.042,66.98) 9.042,66.993 9.521,67.471 9.521,67.662 9.931,68.072 v1(29.667,68.072)
PA2: JP9.6 Module.25 | length 8.6
  Top Layer w0.254: Module.25 33.909,56.439 37.77,60.3 JP9.6
PA3: "<- Select.1" JP9.16 Module.26 | length 42.9
  Top Layer w0.254: Module.26 33.697,57.709 37.685,61.697 40.437,61.697 JP9.16 43.536,64.795 43.536,71.275 48.46,76.2 58.725,76.2 58.953,76.429 63.063,76.429 63.271,76.637
PA4: JP9.5 Module.27 | length 9
  Top Layer w0.254: Module.27 32.084,59.033 33.659,59.033 34.214,59.588 34.214,59.614 35.966,61.366 35.966,62.052 36.754,62.84 JP9.5
PA5: JP9.17 Module.28 | length 12.4
  Top Layer w0.254: Module.28 33.934,60.249 35.357,61.671 35.357,62.84 36.728,64.211 40.411,64.211 JP9.17
PA6: JP9.4 Module.29 U4.3 | length 39.7
  Top Layer w0.254: U4.3 22.859,37.283 23.321,37.744 v1(23.368,37.744) ; v1(27.33,55.855) 27.33,58.115 30.629,61.414 31.924,61.414 Module.29 33.68,61.519 34.747,62.586 34.747,63.144 36.678,65.075 36.703,65.075 37.008,65.38 JP9.4
  Bottom Layer w0.254: v1(23.368,37.744) 25.527,39.903 25.527,48.666 27.33,50.47 v1(27.33,55.855)
PA7: JP9.18 Module.30 U4.11 | length 38
  Top Layer w0.254: U4.11 20.978,42.514 21.996,42.514 22.657,43.175 22.657,45.085 v1(22.631,45.11) ; v1(26.518,55.855) 26.518,58.141 31.039,62.662 31.902,62.662 Module.30 33.807,62.789 34.163,63.144 34.163,63.475 37.44,66.751 40.411,66.751 JP9.18
  Bottom Layer w0.254: v1(22.631,45.11) 22.631,47.219 26.568,51.156 26.568,55.423 26.619,55.474 26.586,55.507 26.586,55.805 v1@26.542,55.849
PB0: JP7.6 Module.15 R1.1 | length 91.5
  Top Layer w0.254: JP7.6 5.766,59.055 8.553,59.055 9.112,58.496 v1(9.144,58.496) ; Module.15 18.079,54.331 20.066,56.318 v1(20.066,66.421) ; R1.1@43.847,43.409 43.847,44.127 45.517,45.796 45.517,62.84 44.501,63.856 44.501,71.45 v1(44.552,71.501)
  Bottom Layer w0.254: v1(9.144,58.496) 14.986,58.496 18.567,54.915 v1(18.644,54.915) ; v1(20.066,66.421) 32.766,66.421 37.935,71.59 39.992,71.59 40.284,71.882 40.284,73.66 41.732,75.108 43.078,75.108 44.552,73.635 v1(44.552,71.501)
PB1: JP7.5 Module.11 R4.1 | length 86.8
  Top Layer w0.254: JP7.5 5.69,61.671 8.534,61.671 9.246,60.96 9.246,60.398 9.394,60.249 9.423,60.249 10.49,59.182 10.49,58.395 11.176,57.709 Module.11 13.083,57.762 13.897,57.762 16.891,60.757 16.891,66.421 17.704,67.234 v1(19.355,67.234) ; v1(45.136,71.984) 45.136,64.16 46.025,63.271 46.025,45.11 45.669,44.755 45.669,43.669 R4.1
  Bottom Layer w0.254: v1(19.355,67.234) 20.98,67.234 21.057,67.31 30.505,67.31 39.243,76.048 43.383,76.048 45.169,74.261 45.169,72.017 v1(45.136,71.984)
PB2: JP7.16 Module.10 | length 8
  Top Layer w0.254: JP7.16 8.331,62.84 9.906,61.265 9.906,60.452 11.379,58.979 Module.10
PB3: "BMP180 Sens.2" "Light Sens.3" "Temp sens.1" JP7.4 Module.9 OLED.3 R17.1 U5.16 | length 206.1
  Top Layer w0.254: JP7.4 5.817,64.084 7.899,64.084 10.533,61.45 10.533,60.993 11.278,60.249 Module.9 13.032,60.252 13.897,60.252 16.358,62.713 16.358,66.802 18.39,68.834 18.898,68.834 18.906,68.826 19.287,68.826 v1(19.355,68.758) ; OLED.3 20.549,25.984 25.832,20.701 R17.1 31.491,20.701 33.828,18.364 U5.16 43.307,18.364 47.574,14.097 59.385,14.097 66.802,6.68 69.621,6.68 71.095,8.153 71.095,11.252 68.783,13.564 ; v1(48.717,70.917) 48.717,70.885 49.428,70.174 49.428,53.543 50.343,52.629 50.343,49.403 52.324,47.422 63.551,47.422 67.715,43.258 68.451,43.258 68.707,43.002 71.476,40.234 71.476,31.267 68.707,28.499 70.561,26.645 70.561,15.338 70.412,15.189 70.409,15.189 68.859,13.64 68.707,13.64
  Bottom Layer w0.254: v1(19.355,68.758) 19.427,68.758 19.681,69.012 31.42,69.012 39.268,76.86 45.923,76.86 46.949,75.835 46.949,72.456 48.006,71.399 48.235,71.399 v1(48.717,70.917)
PB4: "BMP180 Sens.1" "Light Sens.4" "Temp sens.2" JP7.17 Module.8 OLED.4 R18.1 U5.15 | length 190.6
  Top Layer w0.254: JP7.17 7.092,65.348 8.093,65.348 8.458,64.984 8.458,64.465 11.4,61.523 13.025,61.523 Module.8 13.106,61.595 14.3,61.595 15.85,63.144 15.85,67.031 18.61,69.791 19.439,69.791 v1(19.507,69.723) ; OLED.4@23.022,29.718 23.022,25.137 26.318,21.84 33.41,21.84 34.549,20.701 R18.1 36.398,20.701 37.465,19.634 U5.15 43.129,19.634 44.221,18.542 47.473,15.291 60.833,15.291 64.224,11.9 66.688,11.9 ; v1(47.65,72.847) 47.65,70.333 48.336,69.647 48.336,52.73 49.352,51.714 49.352,48.92 51.74,46.533 62.636,46.533 68.707,40.462 68.834,40.462 70.46,38.837 70.46,32.791 68.707,31.039 68.25,30.582 67.869,30.582 65.888,28.6 65.888,12.7 66.688,11.9 ; 68.707,11.1 67.488,11.1 66.688,11.9
  Bottom Layer w0.254: v1(19.507,69.723) 19.558,69.774 31.318,69.774 39.04,77.495 46.177,77.495 47.65,76.022 v1(47.65,72.847)
PB5: JP7.3 Module.7 | length 11.2
  Top Layer w0.254: JP7.3 5.74,66.7 8.103,66.7 9.042,65.761 9.042,64.745 10.998,62.789 Module.7
PC0: JP7.10 Module.21 R3.1 | length 84.3
  Top Layer w0.254: JP7.10 5.766,48.895 14.275,48.895 14.707,48.463 22.456,48.463 25.276,51.283 25.276,52.678 25.733,53.135 25.502,53.367 25.502,60.96 24.409,62.052 v1(24.409,64.516) ; v1(46.457,66.065) 46.457,64.948 47.244,64.16 47.244,46.616 49.93,43.929 49.93,43.731 50.303,43.358 R3.1
  Bottom Layer w0.254: v1(24.409,64.516) 24.917,65.024 35.433,65.024 37.033,66.624 45.965,66.624 46.457,66.133 v1(46.457,66.065)
PC1: JP7.9 Module.20 R2.1 | length 86.5
  Top Layer w0.254: JP7.9 5.715,51.486 9.042,51.486 9.728,50.8 13.462,50.8 15.215,49.047 22.073,49.047 24.409,51.384 24.409,53.149 Module.20 24.429,61.143 23.774,61.798 23.774,64.973 v1(23.8,64.999) ; v1(45.796,68.453) 45.796,64.465 46.634,63.627 46.634,46.05 48.26,44.425 R2.1
  Bottom Layer w0.254: v1(23.8,64.999) 24.613,65.811 34.29,65.811 37.719,69.24 42.062,69.24 42.113,69.291 44.958,69.291 v1(45.796,68.453)
PC4: C10.1 JP7.12 Module.19 PC4.2 R6.1 | length 122.4
  Top Layer w0.254: JP7.12 8.915,52.68 10.109,51.486 13.665,51.486 15.596,49.555 21.438,49.555 23.19,51.308 23.19,53.138 Module.19 23.159,67.178 24.486,68.504 25.756,68.504 30.404,73.152 33.884,73.152 36.83,76.098 36.83,77.902 37.77,78.842 49.147,78.842 52.931,82.626 63.856,82.626 71.247,75.235 71.247,53.436 70.817,53.005 70.817,52.905 70.344,52.432 C10.1 ; R6.1 67.636,50.538 69.057,51.959 69.771,51.959 C10.1 ; PC4.2@68.841,54.698 68.841,54.498 69.114,54.225 69.314,54.225 70.244,53.295 C10.1
PC5: C13.1 JP7.8 Module.18 PC5.2 R7.1 | length 108.8
  Top Layer w0.254: JP7.8 5.817,53.924 8.865,53.924 10.541,52.248 13.564,52.248 14.554,51.257 15.646,50.165 20.663,50.165 21.889,51.392 21.889,52.788 21.889,66.771 24.079,68.961 25.375,68.961 30.226,73.812 33.604,73.812 36.195,76.403 36.195,78.435 37.313,79.553 40.767,79.553 v1(40.792,79.527) ; v1(60.02,69.012) 60.02,56.185 62.182,54.023 R7.1 62.184,52.432 C13.1 65.011,53.295 64.445,53.861 64.03,53.861 63.648,54.244 63.646,54.244 PC5.2@63.609,54.281
  Bottom Layer w0.254: v1(40.792,79.527) 40.818,79.553 45.237,79.553 48.133,76.657 48.133,73.812 49.301,72.644 52.299,72.644 54.356,70.587 58.598,70.587 59.893,69.291
PC6: C19.1 JP7.13 Module.17 PC6.2 R8.1 | length 101.5
  Top Layer w0.254: JP7.13 8.712,55.22 10.795,53.137 10.795,53.111 10.998,52.908 13.738,52.908 15.922,50.724 20.32,50.724 20.619,51.023 Module.17 20.619,55.214 21.26,55.855 21.26,67.158 23.647,69.545 24.943,69.545 29.718,74.32 33.299,74.32 35.662,76.683 35.662,78.638 37.389,80.366 v1(40.792,80.366) ; v1(54.61,71.374) 54.61,56.055 57.254,53.411 ; PC6.2 57.683,53.84 57.254,53.411 ; C19.1 57.257,52.432 R8.1 57.254,53.411
  Bottom Layer w0.254: v1@40.925,80.366 45.364,80.366 48.692,77.038 48.692,74.219 49.835,73.076 53.492,73.076 54.61,71.958 v1(54.61,71.374)
PC7: C20.1 JP7.7 Module.16 PC7.2 R13.1 | length 101.8
  Top Layer w0.254: JP7.7 5.766,56.515 8.484,56.515 11.557,53.442 13.919,53.442 16.18,51.181 19.201,51.181 19.349,51.33 Module.16 19.349,55.036 20.65,56.337 20.65,67.31 23.393,70.053 24.613,70.053 29.489,74.93 32.995,74.93 35.204,77.14 35.204,78.994 37.389,81.178 v1(40.792,81.178) ; v1(49.428,74.574) 50.648,73.355 50.648,54.356 51.525,53.479 51.525,52.903 51.998,52.43 R13.1 ; PC7.2 52.095,54.59 52.095,52.432 C20.1
  Bottom Layer w0.254: v1@41.033,81.105 45.539,81.105 49.428,77.216 v1(49.428,74.574)
PD0: JP9.3 Module.31 | length 8.6
  Top Layer w0.254: Module.31 33.731,64.059 37.478,67.805 38.926,67.805 JP9.3
PD1: JP9.19 Module.32 | length 11.7
  Top Layer w0.254: Module.32 33.782,65.329 37.821,69.367 40.488,69.367 JP9.19
PD3: JP9.20 Module.34 | length 11.7
  Top Layer w0.254: Module.34 33.68,67.869 37.541,71.73 40.132,71.73 41.402,73 JP9.20
PD4: JP9.1 Module.35 | length 9
  Top Layer w0.254: Module.35 34.265,69.139 36.17,71.044 36.17,71.78 37.389,73 JP9.1
ROM_BOOT_RX: JP9.8 Module.22 R19.2 U4.1 | length 51.3
  Top Layer w0.254: v1(18.517,36.601) 19.135,35.983 U4.1 24.062,35.983 25.06,34.986 R19.2 ; v1(18.644,47.752) 18.669,47.777 22.614,47.777 26.546,51.71 26.546,52.746 Module.22 27.392,53.592 27.392,53.866 27.714,54.187 33.791,54.187 38.659,59.055 39.929,59.055 40.284,58.699 40.284,56.464 JP9.8
  Bottom Layer w0.254: v1(18.517,36.601) 17.958,37.16 17.958,47.066 v1(18.644,47.752)
ROM_BOOT_TX: JP9.7 Module.23 R16.2 U4.5 | length 41
  Top Layer w0.254: v1(19.106,39.014) 19.55,38.57 20.934,38.57 U4.5 24.129,38.583 25.288,37.424 R16.2 ; v1(19.583,47.117) 19.609,47.092 23.198,47.092 27.816,51.71 27.816,52.746 Module.23 28.602,52.807 34.087,52.807 JP9.7
  Bottom Layer w0.254: v1(19.106,39.014) 19.106,46.624 19.583,47.102 v1(19.583,47.117)
RTC_VBAT: C12.2 J2.1 U5.14 | length 126.6
  Top Layer w0.5: v1@57.459,35.89 v1@57.511,35.942
  Top Layer w0.6: U5.14 38.71,20.904 37.465,22.149 37.465,23.152 34.468,26.149 C12.2 34.468,29.235 38.913,33.68 55.22,33.68 v1(57.48,35.941)
  Bottom Layer w0.6: J2.1 33.233,73.111 37.338,77.216 37.338,79.705 40.056,82.423 45.574,82.423 50.698,77.299 50.698,75.692 52.197,74.193 54.407,74.193 56.286,72.314 59.969,72.314 63.357,68.926 63.357,47.533 57.48,41.656 v1(57.48,35.941)
USB0_N: JP7.14 Module.13 | length 7.1
  Top Layer w0.178: JP7.14 8.661,57.76 9.728,56.693 9.728,56.642 11.201,55.169 Module.13@13.029,55.169
USB0_P: JP7.15 Module.12 | length 8.3
  Top Layer w0.178: JP7.15 8.534,60.3 10.058,58.776 10.058,57.658 10.16,57.556 10.16,57.455 11.176,56.439 Module.12
USB1_N: U3.6 U4.16 | length 10.3
  Top Layer w0.178: U3.6 11.542,43.165 13.741,45.364 16.078,45.364 16.612,44.831 16.612,44.12 16.275,43.783 U4.16
  Top Layer w0.254: U3.6 10.709,43.165 U3.6@10.877,43.333
USB1_P: U3.4 U4.15 | length 6.6
  Top Layer w0.178: U3.4 11.801,41.265 12.573,42.037 12.573,43.104 13.902,44.433 U4.15
pads on no net: "Light Sens.5" BT1. J1. J1.P$4 J1.P$5 J1.P$6 J1.P$7 U1.6 U4.2 U4.6 U4.8 U4.9 U4.10 U4.12 U4.13 U4.14 U4.19 U4.24 U4.27 U4.28 U5.1 U5.3 U5.4 U5.5 U5.6 U5.7 U5.8 U5.9 U5.10 U5.11 U5.12 USB1.4

## Polygon pours and split planes (outlines as drawn)
GND on Top Layer "NONET_L-01_P-001" (solid, pour order 1): 9.792,85.392 9.843,85.341 10.274,85.341 10.987,84.628 10.987,76.272 11.544,75.715 32.55,75.715 32.779,75.943 32.957,75.943 32.957,76.02 33.465,76.528 33.465,84.554 34.252,85.341 34.506,85.341 34.76,85.595 35.584,85.595 35.634,85.646 71.615,85.646 72.123,85.138 72.123,-0.028 71.71,-0.441 0.14,-0.441 -0.394,0.092 -0.394,84.246 -0.343,84.296 -0.343,84.681 -0.267,84.681 0.368,85.316 1.036,85.316 1.112,85.392
GND on Bottom Layer "NONET_L-01_P-001" (solid, pour order 0): 10.312,85.436 11,84.749 11,76.265 11.506,75.759 32.563,75.759 32.715,75.911 32.918,75.911 32.918,76.013 33.477,76.572 33.477,84.598 34.163,85.284 34.29,85.284 34.595,85.589 35.545,85.589 35.647,85.69 71.628,85.69 72.136,85.182 72.136,0.041 71.653,-0.441 0.196,-0.441 -0.33,0.086 -0.33,84.7 0.203,85.233 0.33,85.233 0.533,85.436

## Keep-outs
Keep-Out Layer:
  lines w0.203: -11.557,-77.089 ccw(c-11.25,-76.782) -11.25,-77.216 ; -0.127,82.931 -0.127,84.499 -0.127,84.604 cw(c0.74,84.604) 0.127,85.217 cw(c1.353,83.991) 1.353,85.725 1.905,85.725 10.033,85.725 ; 10.002,85.725 cw(c10.002,84.424) 10.922,85.344 cw(c10.309,84.731) 11.176,84.731 ; 11.176,84.709 11.229,76.974 ccw(c12.121,76.974) 11.49,76.343 ccw(c12.204,77.057) 12.204,76.048 32.791,76.048 ; 31.648,76.048 32.487,76.048 ccw(c32.487,77.216) 33.655,77.216 33.655,84.328 ; 33.655,84.297 cw(c34.956,84.297) 34.036,85.217 cw(c35.876,83.377) 35.876,85.979 71.497,85.979 cw(c71.497,85.112) 72.111,85.725 cw(c71.497,85.112) 72.365,85.112 72.365,84.455 72.365,0.635
  lines w0.254: -0.127,0.508 -0.127,82.931 ; -0.127,0.527 ccw(c0.18,0.527) -0.037,0.31 0.201,0.071 ccw(c0.635,0.505) 0.635,-0.108 71.622,-0.108 ccw(c71.622,0.635) 72.365,0.635

## Silkscreen, mask and mechanical layers (free items; w line width, h text height)
Top Overlay:
  text "CC2538 Develop Kit" at 35.135,83.141 h1.52
  text "PD4" at 35.328,72.492 h1.27
  text "JT_TMS" at 8.283,72.466 h0.81
  text "PD3" at 42.77,72.415 h1.27
  text "JT_TCK" at 0.336,72.136 h0.81
  text "JT_TDI" at 0.339,69.952 h0.81
  text "PD1" at 42.77,69.926 h1.27
  text "JT_TDO" at 8.283,69.875 h0.81
  text "NRST" at 34.592,69.799 h1.27
  text "PA7" at 42.77,67.412 h1.27
  text "NRST" at 8.283,67.386 h0.89
  text "PD0" at 35.328,67.386 h1.27
  text "PB5" at 0.826,67.335 h1.27
  text "SCL/PB3" at 0.077,65.049 h0.8
  text "PA6" at 35.328,64.973 h1.27
  text "SDA/PB4" at 8.278,64.897 h0.76
  text "PA5" at 42.77,64.795 h1.27
  text "PA4" at 35.328,62.332 h1.27
  text "PA3" at 42.77,62.332 h1.27
  text "PB1" at 0.826,62.255 h1.27
  text "PB2" at 8.283,62.23 h1.27
  text "PA2" at 35.328,59.817 h1.27
  text "PB0" at 0.826,59.741 h1.27
  text "USB+" at 8.283,59.715 h1.27
  text "3V3" at 42.77,59.588 h1.27
  text "PC7" at 0.826,57.175 h1.27
  text "3V3" at 42.77,57.125 h1.27
  text "TX" at 35.156,57.048 h1.27
  text "USB-" at 8.283,57.023 h1.27
  text "PC5" at 0.826,54.635 h1.27
  text "PC6" at 8.283,54.585 h1.27
  text "3V3" at 42.77,54.585 h1.27
  text "RX" at 35.156,54.407 h1.27
  text "PC1" at 0.826,52.172 h1.27
  text "GND" at 35.156,52.172 h1.27
  text "5V" at 42.77,52.172 h1.27
  text "PC4" at 8.283,52.095 h1.27
  text "5V" at 42.77,49.733 h1.27
  text "GND" at 35.003,49.657 h1.27
  text "GND" at 8.283,49.555 h1.27
  text "PC0" at 0.835,49.505 h1.27
  text "UART" at 27.955,45.923 h1.27
  text "SCL" at 64.87,42.443 h1.27
  text "SDA" at 64.739,39.903 h1.27
  text "3V3" at 64.794,37.389 h1.27
  text "GND" at 64.579,34.671 h1.27
  text "LED" at 43.37,31.623 h1.27
  text "SDA" at 64.811,30.404 h1.27
  text "SCL" at 64.819,27.965 h1.27
  text "Nguyen Minh Cuong" at 58.332,26.369 h3.92 r90
  text "Nguyen Minh Cuong" at 58.713,26.115 h3.92 r90
  text "SDA" at 23.724,25.852 h1.27 r90
  text "SCL" at 21.184,25.83 h1.27 r90
  text "3V3" at 15.977,25.805 h1.27 r90
  text "GND" at 18.644,25.596 h1.27 r90
  text "GND" at 64.593,25.349 h1.27
  text "3V3" at 64.819,22.86 h1.27
  text "3V3" at 64.823,18.161 h1.27
  text "GND" at 64.597,15.596 h1.27
  text "University of Technology and Ho Chi Minh City" at 14.727,14.184 h4
  text "SCL" at 64.823,13.157 h1.27
  text "SDA" at 64.815,10.668 h1.27
  text "A" at 12.32,10.541 h12
  text "HCMUT" at 13.798,8.731 h2
  text "Supervisor: Ph.D Vo Que Son" at 4.846,0.896 h1.52
  text "Designed by PhanChuong HCMUT" at 5.5,0.816 h1.52
  text "A" at 28.773,0.356 h3.92
Bottom Overlay:
  text "GND" at 45.473,84.938 h2.78 r180
  text "Supervisor: Ph.D Vo Que Son" at 71.991,78.955 h2.7 r90
  text "Designed by PhanChuong" at 69.552,78.6 h2.7 r90
  text "+" at 15.037,73.431 h1.78 r270
  text "GND" at 20.167,41.453 h1.78
  text "+" at 57.082,0.864 h3.81

## Text inside footprints (layer, text, board x,y; h text height)
BT1: Mechanical 13 "+" at 56.109,4.366 h1.78 r90; Mechanical 13 "-" at 55.982,84.606 h1.78 r90; Bottom Overlay "+" at 68.529,5.916 h1.78 r90; Bottom Overlay "-" at 55.982,84.606 h1.78 r90
Module: Top Overlay "CC2538+CC2592" at 13.538,49.149 h1.27